# Altium PCB IOT_ButtonPCB-v1.1.PcbDoc (part 2 of 2)
Units mil, origin at the board's own origin, x right, y up, seen from the top; angles counter-clockwise.
Board outline 2799.91 x 2755.91 mil, 2 copper layers (Top Layer, Bottom Layer), stack 57 mil thick; 71 components, 42 nets, 268 pads, 127 vias.
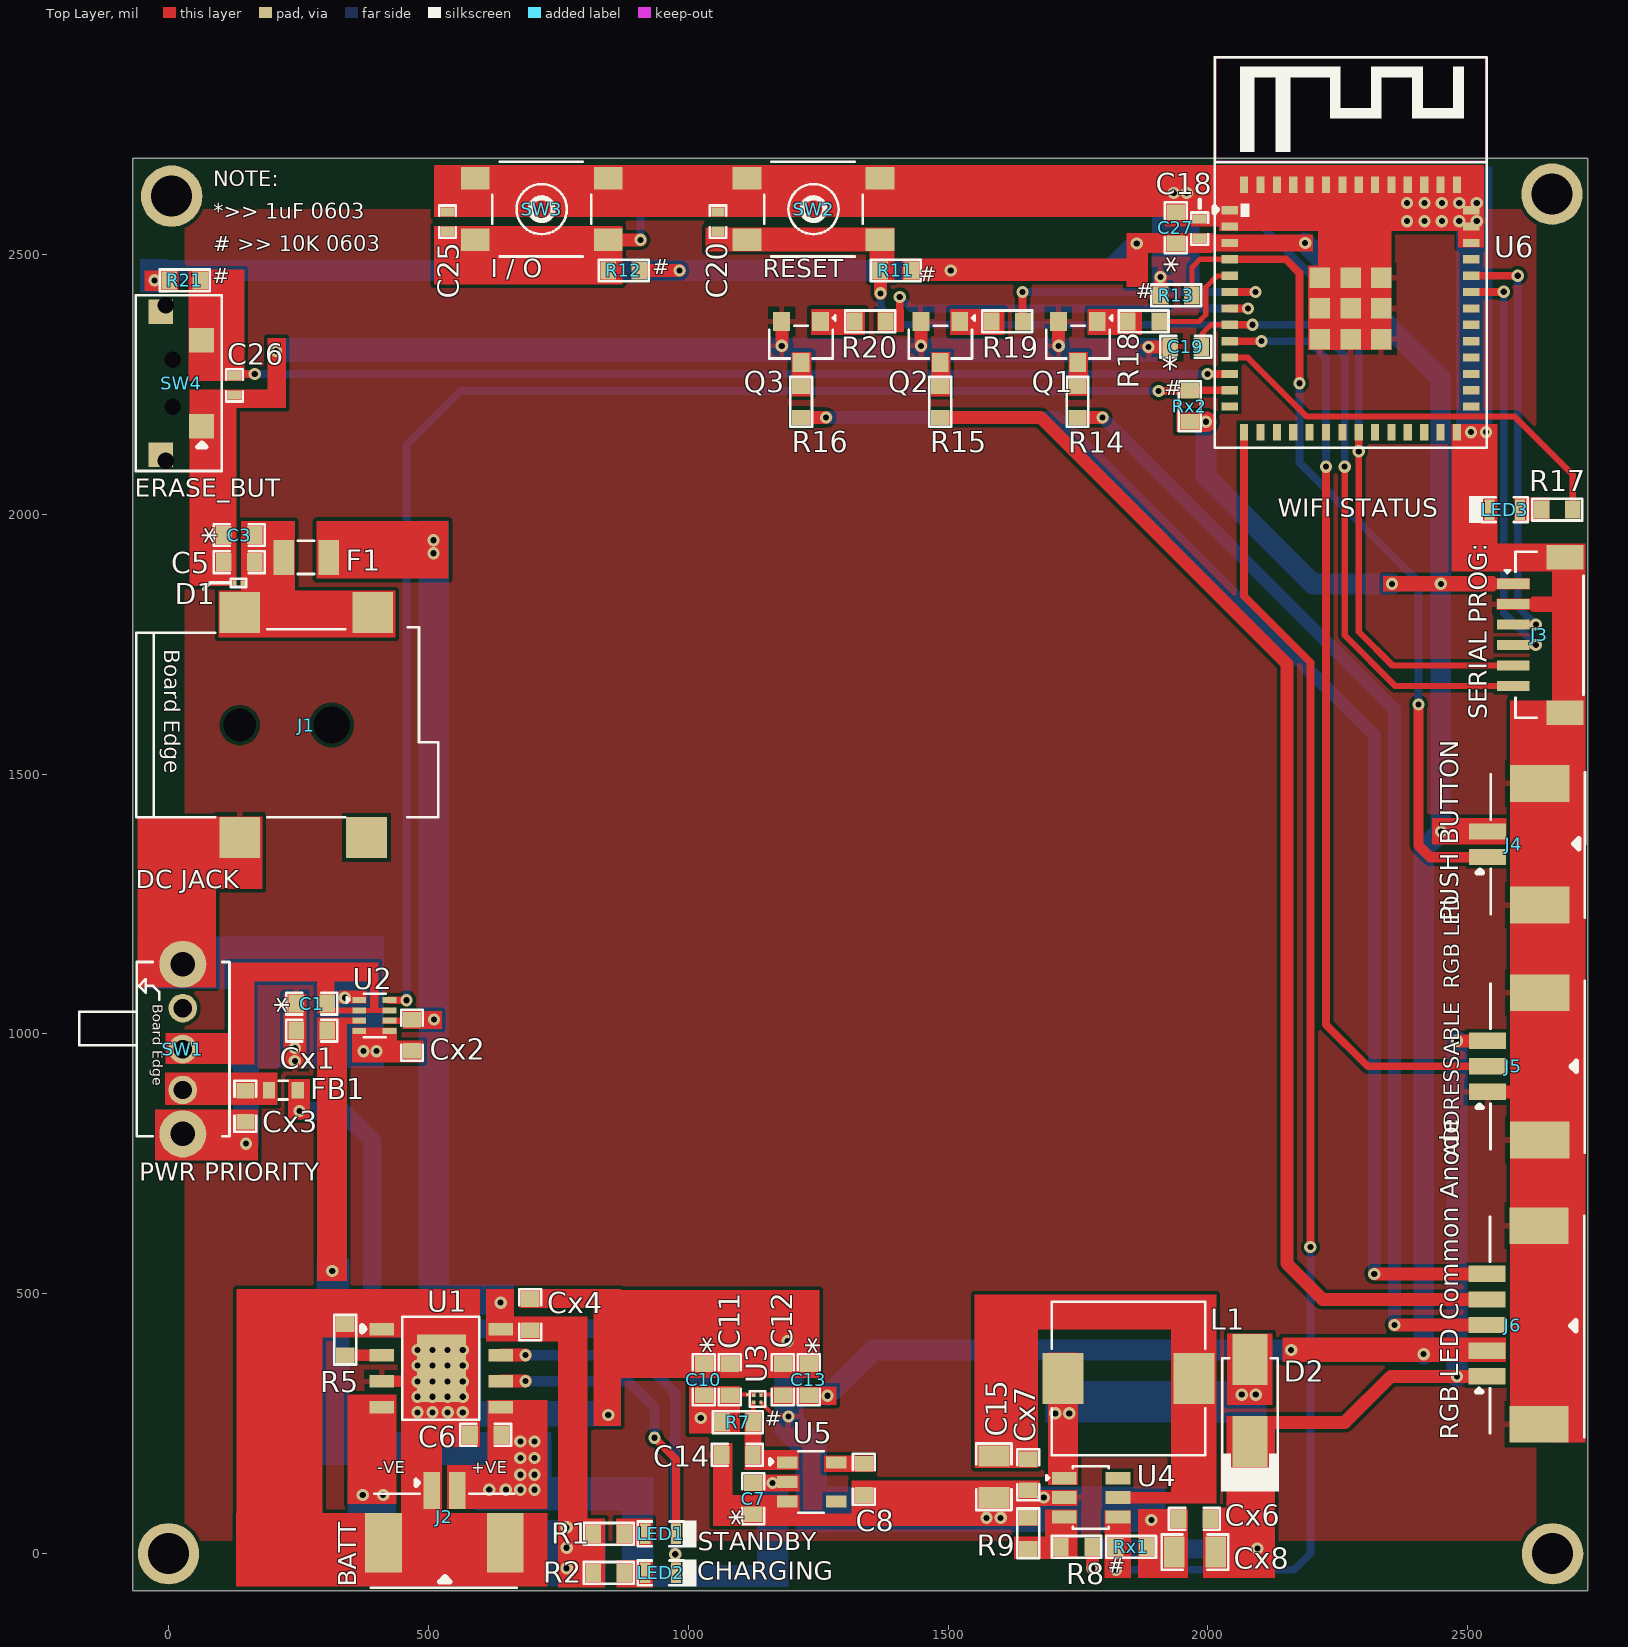
[diagram p0: Top Layer view]

## Part data (continued)
U5: "Power Supply Support Circuit, Fixed, 1 Channel, +3.1V, CMOS, PDSO5", Case/Package=LSSOP, LCSC Part Number=C253184, Manufacturer=Rohm, Max Operating Temperature=125°C, Min Operating Temperature=-25°C, Nominal Supply Voltage=2.4V, Package Body Material=Plastic, Package Equivalence Code=TSOP5/6,.11,37, Package Shape=Rectangular, Package Style="SMALL OUTLINE, LOW PROFILE, SHRINK PITCHMeter", Power Supplies=1.8/5V, Supplier Part Number 1=755-BU4231G-TR, Temperature Grade=OTHER, Threshold Voltage-Nom=3.1V, Adjustable Threshold=No, Category="Voltage Supervisors", Channels=1, ComponentLink1Description=https://datasheet.ciiva.com:443/pdfs/VipMasterIC/IC/ROHM/ROHMS33934/ROHMS34686-1.pdf?src-supplier=IHS+Markit, ComponentLink1URL=https://datasheet.ciiva.com:443/pdfs/VipMasterIC/IC/ROHM/ROHMS33934/ROHMS34686-1.pdf?src-supplier=IHS+Markit, ComponentLink2Description=https://datasheet.ciiva.com/6601/bu42xxg-e-6601781.pdf?src-supplier=Digi-Key, ComponentLink2URL=https://datasheet.ciiva.com/6601/bu42xxg-e-6601781.pdf?src-supplier=Digi-Key, ComponentLink3Description=https://datasheet.ciiva.com/6601/bu42xxg-e-6601782.pdf?src-supplier=Digi-Key, ComponentLink3URL=https://datasheet.ciiva.com/6601/bu42xxg-e-6601782.pdf?src-supplier=Digi-Key, ComponentLink4Description=https://datasheet.ciiva.com/6601/bu42xxg-e-6601784.pdf?src-supplier=Digi-Key, ComponentLink4URL=https://datasheet.ciiva.com/6601/bu42xxg-e-6601784.pdf?src-supplier=Digi-Key, ComponentLink5Description=https://datasheet.ciiva.com/22735/1747282-22735962.pdf?src-supplier=Element14, ComponentLink5URL=https://datasheet.ciiva.com/22735/1747282-22735962.pdf?src-supplier=Element14, ComponentLink6Description=https://datasheet.ciiva.com/15105/getdatasheetpartid-450589-15105309.pdf?src-supplier=Verical, ComponentLink6URL=https://datasheet.ciiva.com/15105/getdatasheetpartid-450589-15105309.pdf?src-supplier=Verical, Height - Seated (Max)=1.25mm, Item Type=IC, JESD-30 Code=R-PDSO-G5, Length=2.9mm, Manufacturer Part Number=BU4231G-TR, Moisture Sensitivity Level=1, Number of Channels=1, Pins=5, Pricing 1="1=0.63000, 10=0.53400, 50=0.53400, 100=0.37000, 1000=0.24200, 10000=0.22000 (USD)", Qualification Status="Not Qualified", Reach SVHC Compliant=Yes, RoHS=Yes, RoHS Compliant=Yes, Stock 1=3336, Supplier 1=Mouser, Surface Mount=Yes, Technology=CMOS, Terminal Form="Gull Wing", Terminal Pitch=0.95mm, Terminal Position=DUAL, Throw Configuration="POWER SUPPLY SUPPORT CIRCUIT", Width=1.6mm
U6: "SMD MODULE W/PCB ANT ESP-U4WDH", LCSC Part Number=C2980305, Manufacturer="Espressif Systems", Supplier Part Number 1=356-ESP32-MINI1PH3Q0, ComponentLink1Description=LCSC, ComponentLink1URL=https://www.lcsc.com/product-detail/WiFi-Modules_Espressif-Systems-ESP32-MINI-1-N4_C2980305.html, Item Type=Module, Manufacturer Part Number=ESP32-MINI-1-N4, Pricing 1="1=2.48000, 10=2.48000, 50=2.48000, 100=2.48000, 1000=2.48000, 10000=2.48000 (USD)", RoHS=No, Stock 1=5903, Supplier 1=Mouser

## Free pads (board coordinates)
  round 118.11 hole 78.74: MH(0,0) MH(6,2612) MH(2662,2616) MH(2663,0)

## Via types
v1: diameter 23.62, hole 11.81, Top Layer to Bottom Layer, 65 vias
v2: diameter 23.62, hole 11.81, Top Layer to Bottom Layer, tented both sides, 62 vias

## Nets (pads, with @x,y where several pads share a name; then routed paths per layer and width w, separated by ;. In a path a pad name is that pad's centre, name@x,y a point inside that pad or via, vN(x,y) a via of type N, cw(c..) or ccw(c..) an arc to the next point about the centre after c; other vN are vias at no path point)
3.3V: C12.2 C13.2 C18.2 C27.2 J3.1 J4.2 J6.2 R11.2 R12.2 R21.2 Rx2.2 U3.A2 U6.3 | length 5765.1
  Top Layer w25: R12.2 v2(983,2469)
  Top Layer w40: Rx2.2 v2(1996,2178)
  Bottom Layer w35: v2@2448,1389.74 v2(2448.13,1389.61)
  Bottom Layer w40: v2(-27,2450) -8,2469 v2(983,2469) v2(1505,2469) 1811,2469 v2(1863,2521) ; v1(1268,304) 1356,392 v2(2160,392) ; v2(1996,2178) 1996,2072 2202,1866 v2(2354,1866) ; v2(2187,2522) 2448,2261 v2(2448,1866) v2@2448,1389.74 ; v2(2415,384) 2415,1356.48 v2(2448.13,1389.61)
5V: Cx2.1 Cx4.2 F1.2 R1.2 R2.2 U1.4 U1.8 U2.6 | length 106.9
  Top Layer w10: Cx2.1@470.16,1025.66 Cx2.1@470.5,1026
  Top Layer w25: 361,289 363,287 405.49,287 U1.4
  Bottom Layer w40: 585,483 v1(639,483)
  other v2: 766.02,-28.01 766.02,11.36 766.02,50.73 373.63,113 413,113 511,1028 510,1925 510,1950
5VIN: C3.2 C5.2 D1.2 F1.1 J1.1
ADDR_RGB: J5.2 U6.9 | length 1824.5
  Top Layer w15: U6.9 v2(2103,2333) ; v2(2227,2091.58) 2227,1018 2307.27,937.73 J5.2
  Bottom Layer w15: v2(2103,2333) 2194,2333 2227,2300 v2(2227,2091.58)
BATT: C6.2 C7.2 Cx1.1 J2.2 U1.5 U2.3 U5.2 | length 132.1
  Top Layer w10: Cx1.1@305,1006 Cx1.1 ; 345.36,1025.66 U2.3 ; v1@1162,135 v1(1162,136)
  Bottom Layer w40: 610.5,210 649.75,170.75 ; 663,157.5 663,184 ; v1@697,123 716,104
  other v1: 617,123 649,123 677,123 704,123 677,152 704,152 677,184 704,184 677,216 704,216
  other v2: 315,544
BLUE: J6.5 R16.2 | length 2609.7
  Top Layer w25: R16.2 v2(1265,2186) ; v2@2320,538.43 J6.5
  Bottom Layer w25: v2(1265,2186) 1709,2186 2320,1575 v2(2320,538)
BLUE_EN: R20.2 U6.7 | length 777.6
  Top Layer w15: R20.2 1380,2373.5 R20.2@1384,2377.5 ; R20.2@1389,2372.5 1392.5,2376 1396.5,2376 1407,2386.5 v2(1407,2418) ; U6.7 v2(2077,2396)
  Bottom Layer w15: v2(1407,2418) 1429,2396 v2(2077,2396)
BOOST_EN: Rx1.2 U4.4 U6.14 | length 2598.9
  Top Layer w15: Rx1.2 Rx1.2@1822.5,12.5 ; v2@1822.5,-30.5 v2(1823,-31) ; U6.14 2069.56,1842.44 2197,1715 v2(2197,590.2)
  Bottom Layer w15: v2(1823,-31) 2166,-31 2197,0 v2(2197,590.2)
CHRG: LED2.2 U1.7 | length 712.4
  Top Layer w15: v2(975,-1) 975.76,-1.76 975.76,-36.24 LED2.2
  Top Layer w25: U1.7 v2(687,382)
  Bottom Layer w20: v2(687,382) 902,382 975,309 v2(975,-1)
EN: C19.2 C20.2 J3.6 R11.1 SW2.3 SW2.4 U6.8 | length 2292.7
  Top Layer w10: C19.2 C19.2@1988.32,2323.32 ; C19.2@1989.64,2324.64 C19.2@1988.32,2323.32 ; U6.8 2005.52,2364.52 1988.32,2347.32 C19.2@1988.32,2323.32
  Top Layer w12: v2(2263,2091.58) 2263,1767 2360.43,1669.57 J3.6
  Top Layer w15: U6.8 v2(2085.48,2364.52)
  Top Layer w25: SW2.3 SW2.4 ; v2(1370,2425) R11.1@1370,2468
  Bottom Layer w15: v2(1370,2425) 1370,2398 1403.48,2364.52 v2(2085.48,2364.52) 2204.48,2364.52 2263,2306 v2(2263,2091.58)
ERASE_BUT: C26.2 R21.1 SW4.2 U6.11 | length 1958.7
  Top Layer w15: 111,2279 111,2269 112,2270 C26.2@130.5,2270 ; C26.2 C26.2@130.5,2270 ; C26.2@130.5,2268 C26.2@138.79,2268 ; v2@170,2270 v2(166,2270) C26.2@130.5,2270 ; v2(1999,2270) U6.11
  Bottom Layer w15: v2(166,2270) v2(1999,2270)
FB: R8.1 R9.2 U4.3
GND: C1.1 C3.1 C5.1 C6.1 C7.1 C8.1 C10.1 C11.1 C12.1 C13.1 C14.1 C15.1 C18.1 C19.1 C20.1 C25.1 C26.1 C27.1 Cx1.2 Cx2.2 Cx3.1 Cx4.1 Cx6.2 Cx7.2 Cx8.1 D1.1 J1.2@137,1377.93 J2.1 J2.MP1 J2.MP2 J3.2 J3.MP1 J3.MP2 J4.MP1 J4.MP2 J5.1 J5.MP1 J5.MP2 J6.MP1 J6.MP2 LED3.2 Q1.2 Q2.2 Q3.2 R5.1 R9.1 R13.1 Rx1.1 SW1.4 SW1.5 SW2.1 SW2.2 SW3.1 SW3.2 SW4.1 U1.1 U1.3 U1.9 U2.1 U2.4 U2.5 U3.B2 U4.2 U5.3 U6.1 U6.2 U6.27 U6.38 U6.39 U6.40 U6.41 U6.42 U6.43 U6.44 U6.45 U6.46 U6.47 U6.48 U6.49 U6.50 U6.51 U6.52 U6.53 U6.54 U6.55 U6.56 U6.57 U6.58 U6.59 U6.60 U6.61 U6.62 U6.63 | length 1881.7
  Top Layer w8: U3.B2 1165.19,266.03 1190.97,266.03 v1(1193,264)
  Top Layer w10: v2(339.31,1069.81) 343,1069.81 346.88,1065.93 365.96,1065.93 U2.1
  Top Layer w15: v1@2500,2158 2505,2158 2506,2159 2534,2159 v1(2535,2158)
  Top Layer w22: U1.3 477,332 U1.9@479,334 ; U1.9@479,336 U1.9@501,336 ; U1.9@508,334 508,350 515,357 U1.9
  Top Layer w25: Q3.2 1179.6,2365.79 1180,2365.39 v2(1180,2324) ; v2(1448,2324) Q2.2@1448,2365.39 ; v2(1712.6,2324) Q1.2@1712.6,2365.39 ; v2(1885.61,2322) C19.1 ; v2(1908.73,2456.27) 1908.73,2421.27 R13.1 ; J5.1 2655.48,888.52
  Top Layer w35: SW4.1 C26.1@114.91,2221 ; v1@242,966 v1@243,966 ; 841,344.5 861.5,365 ; C10.1 C11.1 C12.1 C13.1
  Top Layer w50: SW2.2@1113.05,2645.06 SW2.1@1357.06,2645.06
  Bottom Layer w40: 1232.42,109 1233.42,108 v1@1686,108
  Bottom Layer w50: v2(149,789) 149,960 162,973 v1(243,973) ; 249.81,991.81 269,1011
  other v1: 1891,65 1574,69 1601,69 1684,108 479,272 508,272 537,272 566,272 479,302 508,302 537,302 566,302 479,331 508,331 537,331 566,331 479,362 508,362 537,362 566,362 479,392 508,392 537,392 566,392 1191,409 243,948 375,967 400,967 2506,2158 2383,2564 2416.5,2564 2450,2564 2483.5,2564 2517,2564 2383,2599 2416.5,2599 2450,2599 2483.5,2599 2517,2599 1934,2618 1958.96,2617.96
  other v2: 846,267 207,2314
GREEN: J6.4 R15.2 | length 2430.5
  Top Layer w25: R15.2 1678,2186 2152,1712 2152,558 2220.79,489.21 J6.4
GREEN_EN: R19.2 U6.6 | length 553.5
  Top Layer w15: R19.2@1643,2372 v2(1643,2427.51) ; U6.6 v2(2091.49,2427.51)
  Bottom Layer w15: v2(1643,2427.51) v2(2091.49,2427.51)
IO0: C25.2 J3.5 R12.1 SW3.3 SW3.4 U6.21 | length 2626.6
  Top Layer w12: v2(2290,2121) 2290.03,1773.97 2355.06,1708.94 J3.5
  Top Layer w15: v2(2290,2121) U6.21
  Top Layer w25: SW3.4 907.94,2527.94 v2(908,2528)
  Bottom Layer w15: v2(908,2528) 908,2622 942,2656 2002,2656 2290,2368 v2(2290,2121)
ISET: R5.2 U1.2 | length 70.5
  Top Layer w22: R5.2 U1.2
JACK_DET: Rx2.1 U2.8 U6.12 | length 2729.2
  Top Layer w15: U2.8 v2(458,1065) ; v2(1905,2237) 1963.46,2237 1965,2238.54 U6.12
  Bottom Layer w15: v2(458,1065) 458,2134 561,2237 v2(1905,2237)
NetC8_2: C8.2 U5.5
NetLED1_1: LED1.1 R1.1
NetLED2_1: LED2.1 R2.1
NetLED3_1: LED3.1 R17.1
NetQ1_1: Q1.1 R18.1
NetQ1_3: Q1.3 R14.1 | length 0.8
  Top Layer w20: R14.1 R14.1@1749.3,2246.3 ; Q1.3@1749.3,2291.96 Q1.3
NetQ2_1: Q2.1 R19.1
NetQ2_3: Q2.3 R15.1
NetQ3_1: Q3.1 R20.1
NetQ3_3: Q3.3 R16.1
PUSH_BUT: J4.1 R13.2 U6.4 | length 1616.7
  Top Layer w10: R13.2 1969,2475 1984.5,2490.5 U6.4
  Top Layer w15: U6.4 2149.5,2490.5 2176,2464.01 v2(2176,2252)
  Top Layer w20: v2(2405,1634) 2405,1363 2427.61,1340.39 J4.1
  Bottom Layer w15: v2(2176,2252) 2176,2099 2405,1870 v2(2405,1634)
PWR_EN: C14.2 R7.1 U3.B1 U5.1
RED: J6.3 R14.2 | length 2204.4
  Top Layer w25: R14.2 v2(1797,2186) ; v2(2359,440) J6.3
  Bottom Layer w25: v2(1797,2186) 2359,1624 v2(2359,440)
RED_EN: R18.2 U6.5 | length 203.5
  Top Layer w10: R18.2 1983,2371 1995.73,2383.73 1995.73,2436.73 2017.59,2458.59 2041.58,2458.59 U6.5
RXD: J3.4 U6.35 | length 811.2
  Top Layer w15: U6.35 v2@2569,2427.51 ; J3.4 v2(2630.78,1748.31)
  Bottom Layer w15: v2(2569,2428) 2569,1810.09 v2(2630.78,1748.31)
STDBY: LED1.2 U1.6 | length 576.4
  Top Layer w15: v2(935,223) 976.53,181.47 LED1.2
  Top Layer w25: U1.6 v2(687,332)
  Bottom Layer w20: v2@687.98,332 885,332 935,282 v2(935,223)
SW: D2.2 L1.2 U4.1
  other v1: 1706,270 1733,270 2065,306 2092,306
TXD: J3.3 U6.36 | length 818.6
  Top Layer w15: U6.36 v2(2596.01,2459.01) ; J3.3 v2(2630.78,1787.68)
  Bottom Layer w15: v2(2596.01,2459.01) 2596.01,1822.45 v2@2630.74,1787.72
V_OR: C1.2 SW1.2 U2.2 U2.7 | length 128
  Top Layer w10: C1.2 305.5,1056 315.5,1046 366.21,1046 U2.2 U2.7
  Top Layer w25: 136,1113.5 136.5,1114 ; 304.79,1113 305.29,1112.5
V_SYS##: C15.2 Cx7.1 L1.1 U4.5 | length 356.1
  Top Layer w22: U4.5 1871.79,108 1940,108 1972.98,140.98 L1.1
VBOOST: Cx6.1 Cx8.2 D2.1 J5.3 J6.1 R8.2 | length 1630.7
  Top Layer w25: R8.2 1778,12 v1(1778,-28) ; D2.1@2089,196 2089,239.75 2101.96,252.71 2263.4,252.71 2351.68,341 v2(2479,341) 2536.05,341 J6.1 ; v2(2479,986.94) J5.3
  Bottom Layer w25: v1(1778,-28) 1778,3.5 1784.5,10 v1(2095,10)
  Bottom Layer w40: v2(2479,341) v2(2479,986.94)
VCC: Cx3.2 FB1.2 SW1.3
VCC#: C10.2 C11.2 FB1.1 R7.2 U3.A1 | length 1246.4
  Bottom Layer w35: v1(252,852) 334,852 392,794 392,476 435,433 926,433 1024,335 v1(1024,261)
WIFI_STAT: R17.2 U6.10 | length 820.4
  Top Layer w12: U6.10 2076.47,2301.53 2190,2188 2590,2188 2702,2076 R17.2
pads on no net: J1.2@137,1594.46 J1.3 SW1.1 SW4.3 SW4.4 SW4.MH U4.6 U5.4 U6.13 U6.15 U6.16 U6.17 U6.18 U6.19 U6.20 U6.22 U6.23 U6.24 U6.25 U6.26 U6.28 U6.29 U6.30 U6.31 U6.32 U6.33 U6.34 U6.37

## Polygon pours and split planes (outlines as drawn)
GND on Top Layer "GND_L01_P000" (solid, remove dead copper, pour order 0): 31,25 2632,25 2632,2587 31,2587
GND on Bottom Layer "GND_L02_P001" (solid, remove dead copper, pour order 1): 31,25 2632,25 2632,2587 31,2587

## Other copper
Top Layer:
  region net EN: 1397,2448 1397,2517.26 1348.26,2517.26 1348.26,2448
  rectangle net GND: 190,2204 226,2339
  region net GND: 127,2240 127,2204 217,2204 217,2240
  rectangle net V_SYS##: 1929,97 2016,499
  region net SW: 2124,286 2124,424 2037,424 2037,286
  region net GND: 871,246 871,508 818,508 818,246
  rectangle net GND: 821,338.5 1253,507
  region net GND: 172,855 -26,855 -26,757 172,757
  region net VCC#: 272,835 272,913 230,913 230,835
  region net VCC: -6.33,925.5 -6.33,863 210,863 210,925.5
  region net V_OR: -6,1002 -6,942 153,942 153,1002
  region net V_OR: 165,1138 114,1138 114,941 165,941
  rectangle net GND: 328,1059 381,1084
  region net V_OR: 357,1039.08 357,1051 286,1051 286,1039.08
  region net V_OR: 319,1111 286,1111 286,1041 319,1041
  region net V_OR: 404,1101 404,1138 122,1138 122,1101
  rectangle net V_OR: 388,1045 404,1113
  rectangle net GND: 353,962 440,1012
  rectangle net 5V: 412,1019 458,1032
  region net BATT: 343.13,1024 297.13,1024 297.13,525 343.13,525
  region net BATT: 380,1032 286,1032 286,1019 380,1019
  region net 3.3V: 19,2430 19,2469 -46,2469 -46,2430
  rectangle net GND: 1217,347.5 1251,382.5
  rectangle net 3.3V: 1939,2158 1988,2198
  rectangle net GND: 1197,53 1387,77
  rectangle net 5V: 611,408 665,509
  rectangle net GND: 353,945 491,987
  rectangle net BATT: 286,525 326,1024
  rectangle net 3.3V: 1843,2437 1885,2541
  rectangle net 5V: 285,1876 539,1987
  rectangle net 5V: 450,1010 526,1044
  rectangle net GND: 1668,92 1749,123
  rectangle net GND: 1048,59 1085,213
  region net 3.3V: 1137,310.22 1137,302.22 1250,302.22 1250,310.22
  rectangle net 3.3V: 1162,286 1285,322
  rectangle net V_SYS##: 1551,431 2016,499
  rectangle net V_SYS##: 1551,165 1673,499
  rectangle net VBOOST: 2036,76 2129,265
  rectangle net SW: 1692,132 1750,387
  rectangle net GND: 1865,-47 1962,86
  rectangle net FB: 1627,-10 1749,33
  rectangle net FB: 1686,-10 1749,85
  rectangle net GND: 1314.17,53 1677,141
  region net GND: 1677,141 1314.17,141 1314.17,95 1677,95
  region net NetC8_2: 1357,189.4 1260.83,189.4 1260.83,157.4 1357,157.4
  rectangle net GND: 1048,53 1214,112.6
  rectangle net BATT: 1108,120 1214,152
  rectangle net VCC#: 1001,231 1100,323
  region net VCC#: 1012,310.22 1012,302.22 1129.22,302.22 1129.22,310.22
  rectangle net PWR_EN: 1108,190 1141,274
  rectangle net PWR_EN: 1108,161 1213,200
  rectangle net PWR_EN: 1121,163 1129,294.22
  rectangle net GND: 675,472.5 870,509
  rectangle net VBOOST: 1990,-47 2129,89
  rectangle net BOOST_EN: 1801,-47 1852,83
  rectangle net GND: 221,934 265,1077
  rectangle net 5V: 753,-65 840,68
  rectangle net BATT: 536,86 729,171
  rectangle net ERASE_BUT: 38,2256 146,2471
  rectangle net GND: 40,1862 131,2240
  rectangle net 5VIN: 139,1821 243,1987
  rectangle net 5VIN: 96,1763 437,1853
  rectangle net GND: -60,1089 91,1294
  rectangle net GND: 1964.15,2644.43 2531,2672
  region net GND: 519,447 519,205 599.29,205 599.29,447
  region net 5V: 806,456 611,456 611,408 806,408
  rectangle net 5V: 344,96 439,306
  region net 5V: 806,-65 806,453 749,453 749,-65
  region net BATT: 729,86 729,295.46 613.71,295.46 613.71,86
  rectangle net GND: 131,23 296,509
  rectangle net 3.3V: 2431,1365 2574,1416
  region net NetQ1_3: 1769.3,2227.3 1769.3,2312.3 1731.3,2312.3 1731.3,2227.3
  region net NetQ2_3: 1505,2227 1505,2312 1467,2312 1467,2227
  region net NetQ3_3: 1237,2227 1237,2312 1199,2312 1199,2227
  rectangle net NetQ1_1: 1768.6,2345 1872.6,2395
  rectangle net NetQ2_1: 1504,2345 1608,2395
  rectangle net NetQ3_1: 1236,2345 1340,2395
  rectangle net IO0: 511,2442 873,2555
  rectangle net GND: 2212,2473 2353,2551
  rectangle net GND: 2192,2316 2353,2479
  rectangle net NetLED2_1: 862,-65 932,-12
  rectangle net NetLED1_1: 861,15 931,68
  rectangle net 3.3V: 2143,369 2573,416
  rectangle net GND: 2469,1890 2726,1944
  rectangle net GND: 2469,1890 2557,2174
  rectangle net NetLED3_1: 2590,1987 2657,2032
  rectangle net GND: -60,1279 181,1418
  rectangle net BLUE_EN: 1363,2351 1415,2394
  rectangle net 3.3V: 1411,2449 1885,2492
  rectangle net 3.3V: 1843,2503 2009,2541
  region net GND: 2695,257.68 2695,1642 2581,1642 2581,257.68
  rectangle net GND: 150,416 599,509
  region net GND: 447,447 447,0 526,0 526,447
  region net GND: 729,78 130,78 130,-63 729,-63
  region net GND: 2726,214 2726,1944 2662,1944 2662,214
  rectangle net GND: 2481,2513 2531,2553.5
  rectangle net GND: 1917,2554 2039,2648
  rectangle net GND: 2021,2545 2531,2659.43
  rectangle net 3.3V: 1960,2506 2202,2538
  rectangle net GND: 511,2572 1454,2672
  rectangle net EN: 1033,2506 1397,2552
  rectangle net GND: 1412,2572 2007,2672
  pour cut-out: 1676,185 2016,185 2016,485 1677,486 1676,486
  region net GND: 2619.59,1816.48 2555.59,1816.48 2555.59,1837.48 2619.59,1837.48 2623.59,1841.48 2720,1841.48 2720,1812.48 2623.59,1812.48
  region net 3.3V: 2555,1877 2619,1877 2619,1856 2555,1856 2551,1852 2337,1852 2337,1881 2551,1881
Bottom Layer:
  region net GND: 1267.5,215.5 1208.5,274.5 1165.87,231.87 1224.87,172.87
  region net GND: 1166,426 1166,230.98 1222,230.98 1222,426
  region net GND: 1206,217 1206,41 1267,41 1267,217
  region net 3.3V: -55.27,2491 -55.27,2426.93 1,2426.93 1,2491
  region net VBOOST: 1763,27 1763,-9 2120.73,-9 2120.73,27
  region net GND: 1918.15,129 1211.42,129 1211.42,42.08 1918.15,42.08
  region net SW: 2113,332 1687,332 1687,252 2113,252
  region net GND: 871,294 450,294 450,245 871,245
  region net BATT: 1192.73,148 1132,148 1132,-64 1192.73,-64
  region net BATT: 1186,-64 1186,-22 872.36,-22 872.36,-64
  rectangle net BATT: 872.05,-64 933,141.12
  region net BATT: 591,148 591,82.95 933,82.95 933,148
  region net BATT: 285.12,233.95 285.12,171 736,171 736,233.95
  region net BATT: 348,568 285,568 285,186 348,186
  region net 5V: 540,1988 481,1988 481,459 540,459
  region net 5V: 665,459 665,518 505,518 505,459
  rectangle net GND: 449,247 602,407
  rectangle net 5V: 344,-63 438,139
  rectangle net 5V: 344,-63 842,65
  rectangle net GND: -60,1087 415,1188
  rectangle net GND: 120,935 415,1188
  rectangle net BATT: 589,84 737,231
  rectangle net GND: 2366,2545 2547,2669
  rectangle net GND: 2477,2142 2547,2669
  rectangle net GND: 190,2293 1904,2339
  rectangle net GND: 1892,2444 1984,2637
  pour cut-out: 1676,185 2016,185 2016,485 1677,486 1676,486

## Silkscreen, mask and mechanical layers (free items; w line width, h text height)
Top Overlay:
  lines w7: 68,1856 80,1868 118.87,1868
  lines w8: 1984,2589 1984,2605
  text "NOTE:" at 85.89,2621.16 h50
  text "*>> 1uF 0603" at 85.89,2559.3 h50
  text "# >> 10K 0603" at 85.89,2496.3 h50
  text "*" at 1977.65,2496 h80 r90
  text "#" at 1478,2485.46 h50 r180
  text "#" at 931,2452.54 h50
  text "I / O" at 620,2444 h60
  text "RESET" at 1143,2444 h60
  text "#" at 84,2434.54 h50
  text "#" at 1861,2405.54 h50
  text "*" at 1911,2242.35 h80
  text "#" at 1916,2219.54 h50
  text "ERASE_BUT" at -64.95,2022 h60
  text "WIFI STATUS" at 2134,1984 h60
  text "*" at 30.35,1975 h80 r270
  text "SERIAL PROG:" at 2548,1606 h60 r90
  text "DC JACK" at -63.2,1269 h60
  text "PUSH BUTTON" at 2493.07,1216.85 h60 r90
  text "*" at 169.85,1071.5 h80 r270
  text "ADDRESSABLE  RGB LED" at 2493,762.81 h50 r90
  text "PWR PRIORITY" at -56.5,706 h60
  text "*" at 988.35,417 h80 r270
  text "*" at 1191.35,416 h80 r270
  text "#" at 1147,236.54 h50
  text "RGB LED Common Anode" at 2493.04,219.32 h60 r90
  text "-VE" at 401.56,147.19 h40
  text "+VE" at 581.98,147.19 h40
  text "*" at 1044.35,86 h80 r270
  text "STANDBY" at 1017.87,-5 h60
  text "#" at 1807,-46.46 h50
  text "CHARGING" at 1016.87,-62 h60
  text "BATT" at 372.44,-64 h60 r90
Bottom Overlay:
  drawing of 3068 lines, arcs and shapes, not listed
  text "ZERO CARBON FOOTPRINT" at 1840,1192 h40
Dimension:
  circle w10: c1330.95,1306.95 r787.4
  lines w10: 543.6,519.6 2118.4,519.6 2118.4,2094.4 543.6,2094.4 543.6,519.6
Board Outline:
  lines w10: -69,-71 2730.91,-71 2730.91,2684.91 -69,2684.91 -69,-71 ; 1380.95,2684.91 1380.95,2684.91

## Dimensions
-69,-71 to -69,2684.91 on Dimension
2730.91,-71 to -69,-71 on Dimension
2118.4,2094.4 to 2118.4,519.6 on Dimension
543.6,2094.4 to 2118.4,2094.4 on Dimension

## Text inside footprints (layer, text, board x,y; h text height)
J1: Top Overlay "Board Edge" at -8.05,1740.46 h30 r270
SW1: Top Overlay "Board Edge" at -30.75,1056.94 h19.68 r270